# Altium PCB ePBR23_ACU_Power_rev0.PcbDoc (part 4 of 4)
Units mil, origin at the board's own origin, x right, y up, seen from the top; angles counter-clockwise.
Board outline 8165 x 3858 mil, 2 copper layers (Top Layer, Bottom Layer); 138 components, 121 nets, 515 pads, 2055 vias.
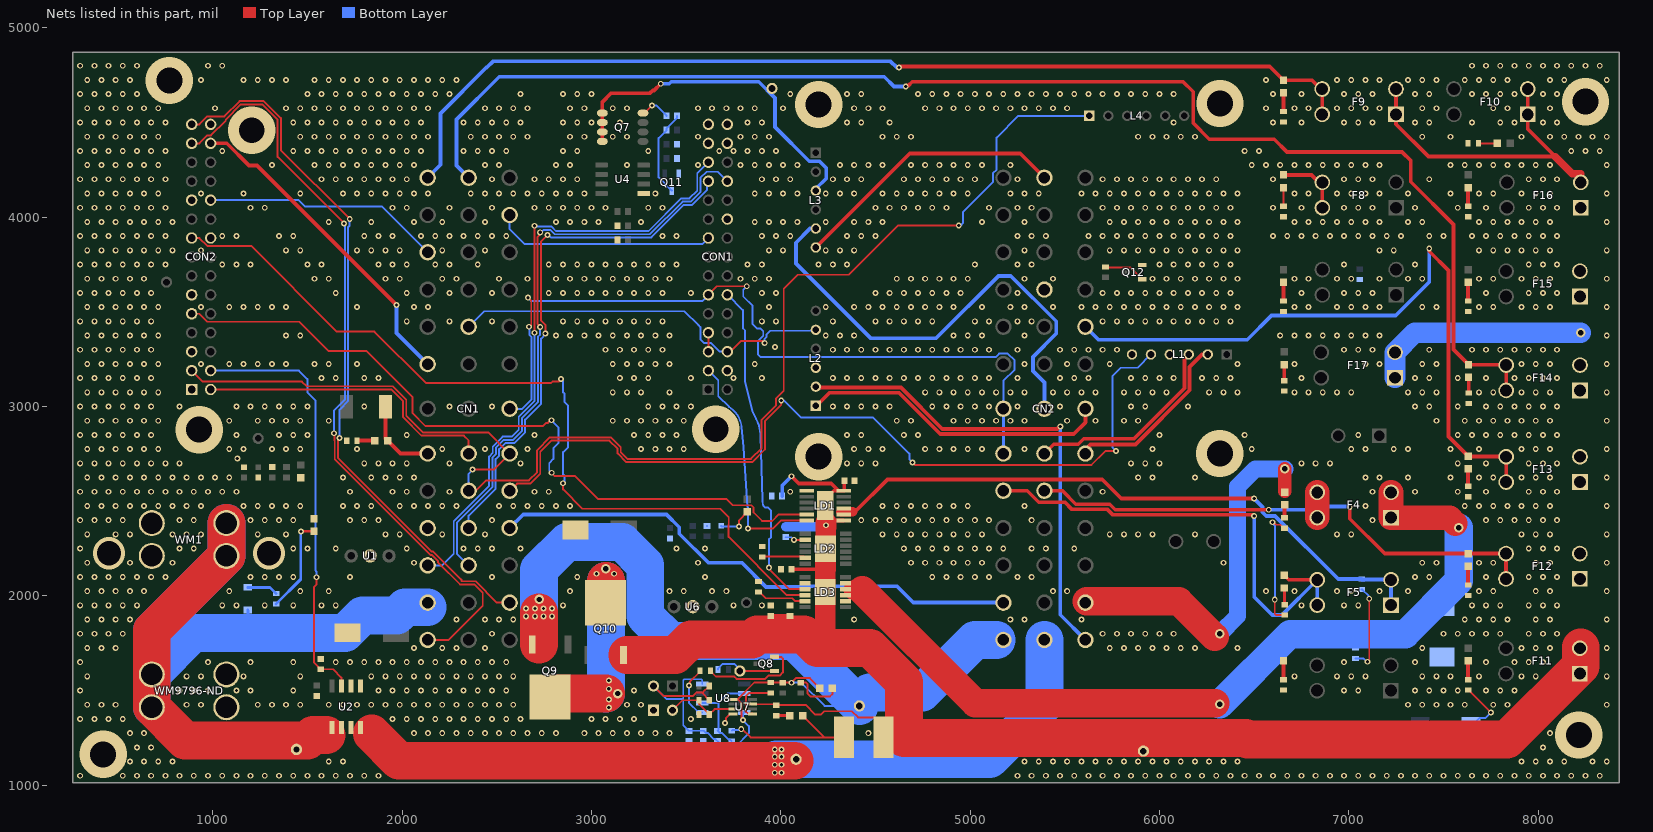
[diagram p3: the nets of this part, all layers, seen from the top]

## Via types
v1: diameter 31, hole 17, Top Layer to Bottom Layer, 2028 vias
v2: diameter 50, hole 28, Top Layer to Bottom Layer, 12 vias
v3: diameter 250, hole 137, Top Layer to Bottom Layer, 11 vias
v4: diameter 170, hole 128, Top Layer to Bottom Layer, 4 vias

## Nets (pads, with @x,y where several pads share a name; then routed paths per layer and width w, separated by ;. In a path a pad name is that pad's centre, name@x,y a point inside that pad or via, vN(x,y) a via of type N, cw(c..) or ccw(c..) an arc to the next point about the centre after c; other vN are vias at no path point) (continued)
GND: C1.1 C2.1 C3.1 C4.1 C5.1 C6.2 C9.2 C11.1 C12.1 C13.1 C14.1 C15.1 C16.2 C17.1 C18.1 C20.1 C21.1 CN1.28 CN2.29 CON1.A3 CON1.A4 CON1.A14 CON1.A15 CON1.B2 CON1.B10 CON1.B14 CON1.B15 CON2.A1 CON2.A3 CON2.A6 CON2.A11 CON2.B9 CON2.B15 D1.2 D2.1 D4.2 D7.2 D22.1 D23.1 JMP2.1 L1.4 L1.6 L2.3 LD1.1 LD2.2 LD3.2 Q11.2 Q12.2 R1.1 R3.2 R9.1 R12.1 R14.2 R15.1 R21.2 R22.2 R23.2 R25.2 R26.2 R27.2 R28.2 R29.2 R30.2 R31.2 R32.2 R33.2 R34.2 R36.2 R37.1 R38.2 R39.2 R42.1 R44.1 R45.1 R48.2 R50.1 R70.1 R71.1 U1.2 U2.5 U2.6 U4.1 U6.2 U7.4 U8.1 WM1.2 WM9796-ND.2 | length 3027.6
  Top Layer w10: v1(3516,1526) 3520.02,1530.02 3520.02,1547.05 3573.44,1600.47 R14.2@3573.44,1604.41 ; CON1.A3@3618.02,3290 CON1.A4@3618.02,3390 ; v1(3706,1329) 3710.02,1333.02 3710.02,1354.35 3732.28,1376.61 U7.4@3748.43,1376.61 ; v1(3779.76,2366.14) 3779.76,2399.65 D4.2@3823.65,2443.53 ; v1@3794.5,1299.1 3840.6,1253 4229.59,1253 ; v1(4070,2295.98) LD2.2@4129.46,2295.98 ; D7.2@4115.15,1367.44 4229.59,1253 ; LD3.2@4121.42,2074.06 LD3.2@4128.23,2067.24 ; C16.2@4333.64,1310.09 C16.2@4333.64,1253 4229.59,1253 ; v1(6597.67,2388.67) 6603.35,2388.67 6616.58,2375.43 6638.07,2375.43 6656.06,2357.44 R22.2@6660,2357.44 ; v1(6609,1980) 6609,1906.02 6616.58,1898.44 R23.2@6661,1898.44 R23.2@6652.22,1907.22 ; v1(7099.12,1652) 7099.12,1657.68 7108.12,1666.68 v1(7108.12,1984.86) ; R28.2@7630,1502.44 7633.94,1502.44 7750,1386.38 v1(7750,1384)
  Bottom Layer w10: v1(3516,1526) 3516,1434.16 3565.52,1384.65 U8.1@3585.2,1384.65 ; R15.1@3610,2370.06 R15.1@3610.06,2370 ; C13.1@3685,2370 3688.86,2366.14 v1(3779.76,2366.14) ; R42.1@3740.87,1287.56 3745.31,1292.01 3787.41,1292.01 v1(3791.43,1296.03) ; C17.1@4026,2309.88 4054.44,2309.88 4068.34,2295.98 v1(4070,2295.98) ; v1(6597.67,2388.67) 6597.67,2382.98 6609.12,2371.53 v1@6609.12,1980 ; R37.1@7035,1670 7075.44,1670 7093.44,1652 v1(7099.12,1652) ; R39.2@7068,2033.44 7071.94,2033.44 7104.1,2001.27 7104.1,1988.88 v1(7108.12,1984.86) ; D23.1@7644.86,1295 7644.86,1310 7689.86,1355 7721,1355 v1(7750,1384)
  other v1: 300,1050 525,1050 600,1050 675,1050 750,1050 825,1050 900,1050 975,1050 1050,1050 1125,1050 1200,1050 1275,1050 1350,1050 1425,1050 1500,1050 1575,1050 1650,1050 1725,1050 1800,1050 1875,1050 5250,1050 5325,1050 5400,1050 5475,1050 5550,1050 5625,1050 5700,1050 5775,1050 5850,1050 5925,1050 6000,1050 6075,1050 6150,1050 6225,1050 6300,1050 6375,1050 6450,1050 6525,1050 6600,1050 6675,1050 6750,1050 6825,1050 6900,1050 6975,1050 7050,1050 7125,1050 7200,1050 7275,1050 7350,1050 7425,1050 7500,1050 7575,1050 7650,1050 7725,1050 7800,1050 7875,1050 7950,1050 8025,1050 8100,1050 8175,1050 8250,1050 8325,1050 562.5,1125 637.5,1125 712.5,1125 787.5,1125 1612.5,1125 1687.5,1125 5287.5,1125 5362.5,1125 5437.5,1125 5512.5,1125 5587.5,1125 5662.5,1125 5737.5,1125 5812.5,1125 5887.5,1125 5962.5,1125 6037.5,1125 6112.5,1125 6187.5,1125 6262.5,1125 6337.5,1125 6412.5,1125 7912.5,1125 7987.5,1125 8062.5,1125 8137.5,1125 8287.5,1125 8362.5,1125 600,1200 675,1200 8025,1200 562.5,1275 637.5,1275 2062.5,1275 2137.5,1275 2212.5,1275 2287.5,1275 2362.5,1275 2437.5,1275 2512.5,1275 2587.5,1275 2662.5,1275 2737.5,1275 2812.5,1275 2962.5,1275 3037.5,1275 3112.5,1275 3187.5,1275 3262.5,1275 3337.5,1275 3412.5,1275 4462.5,1275 8062.5,1275 300,1350 375,1350 450,1350 525,1350 1950,1350 2025,1350 2100,1350 2175,1350 2250,1350 2325,1350 2400,1350 2475,1350 2550,1350 2625,1350 3000,1350 3075,1350 3150,1350 3225,1350 3525,1350 337.5,1425 412.5,1425 487.5,1425 862.5,1425 937.5,1425 1237.5,1425 1312.5,1425 1387.5,1425 1462.5,1425 1612.5,1425 1687.5,1425 1762.5,1425 1837.5,1425 1912.5,1425 1987.5,1425 2062.5,1425 2137.5,1425 2212.5,1425 2287.5,1425 2362.5,1425 2437.5,1425 2512.5,1425 2587.5,1425 3187.5,1425 3262.5,1425 7312.5,1425 7387.5,1425 7462.5,1425 7537.5,1425 7612.5,1425 7762.5,1425 7837.5,1425 8362.5,1425 300,1500 825,1500 900,1500 975,1500 1125,1500 1200,1500 1425,1500 1875,1500 1950,1500 2025,1500 2100,1500 2175,1500 2250,1500 2325,1500 2400,1500 2475,1500 2550,1500 3225,1500 6975,1500 7050,1500 7350,1500 7425,1500 7500,1500 7575,1500 7725,1500 7800,1500 7875,1500 337.5,1575 862.5,1575 937.5,1575 1162.5,1575 1462.5,1575 1837.5,1575 1912.5,1575 1987.5,1575 2062.5,1575 2137.5,1575 2212.5,1575 2287.5,1575 2362.5,1575 2437.5,1575 2512.5,1575 2587.5,1575 6712.5,1575 6937.5,1575 7012.5,1575 7087.5,1575 7387.5,1575 7462.5,1575 7537.5,1575 7687.5,1575 7912.5,1575 7987.5,1575 8362.5,1575 300,1650 975,1650 1200,1650 1425,1650 1650,1650 1725,1650 1800,1650 1875,1650 1950,1650 2025,1650 2100,1650 2175,1650 2250,1650 2325,1650 2400,1650 2475,1650 2550,1650 6975,1650 7350,1650 7725,1650 7875,1650 7950,1650 8025,1650 337.5,1725 412.5,1725 487.5,1725 2062.5,1725 2212.5,1725 2287.5,1725 2437.5,1725 5737.5,1725 5812.5,1725 5887.5,1725 5962.5,1725 6037.5,1725 6112.5,1725 6187.5,1725 6412.5,1725 7387.5,1725 7912.5,1725 7987.5,1725 8062.5,1725 8362.5,1725 300,1800 375,1800 450,1800 525,1800 2475,1800 5700,1800 5775,1800 5850,1800 5925,1800 6000,1800 6075,1800 7500,1800 7575,1800 7650,1800 7725,1800 7800,1800 7950,1800 8025,1800 8100,1800 337.5,1875 412.5,1875 487.5,1875 562.5,1875 2287.5,1875 2437.5,1875 2512.5,1875 2587.5,1875 4387.5,1875 5212.5,1875 5287.5,1875 5587.5,1875 7612.5,1875 7687.5,1875 7762.5,1875 7837.5,1875 7987.5,1875 8062.5,1875 8362.5,1875 300,1950 375,1950 450,1950 525,1950 600,1950 1050,1950 1125,1950 1275,1950 1425,1950 1575,1950 1650,1950 2850,1950 3750,1950 3900,1950 6750,1950 6975,1950 7050,1950 7650,1950 7725,1950 7800,1950 7950,1950 8025,1950 8100,1950 337.5,2025 412.5,2025 487.5,2025 562.5,2025 637.5,2025 1087.5,2025 1462.5,2025 1612.5,2025 2887.5,2025 3412.5,2025 3487.5,2025 3637.5,2025 3712.5,2025 5437.5,2025 5512.5,2025 6562.5,2025 6712.5,2025 6937.5,2025 7012.5,2025 7162.5,2025 7312.5,2025 7687.5,2025 7762.5,2025 7987.5,2025 8062.5,2025 8362.5,2025 300,2100 375,2100 450,2100 525,2100 600,2100 675,2100 750,2100 1200,2100 1275,2100 1350,2100 1425,2100 1725,2100 2475,2100 2925,2100 3600,2100 4800,2100 4875,2100 4950,2100 5025,2100 5100,2100 5250,2100 5325,2100 7350,2100 7425,2100 7725,2100 7950,2100 8025,2100 8100,2100 337.5,2175 562.5,2175 787.5,2175 2062.5,2175 3562.5,2175 4687.5,2175 4762.5,2175 4837.5,2175 4912.5,2175 4987.5,2175 5062.5,2175 6337.5,2175 7387.5,2175 7462.5,2175 7687.5,2175 7762.5,2175 7987.5,2175 8062.5,2175 8362.5,2175 300,2250 825,2250 900,2250 1425,2250 1500,2250 1650,2250 2025,2250 2325,2250 2400,2250 2475,2250 2625,2250 3450,2250 3600,2250 4650,2250 4725,2250 4800,2250 4875,2250 4950,2250 5025,2250 5100,2250 5175,2250 5325,2250 5400,2250 5550,2250 7950,2250 8025,2250 8100,2250 337.5,2325 487.5,2325 562.5,2325 787.5,2325 862.5,2325 937.5,2325 1237.5,2325 1387.5,2325 1912.5,2325 1987.5,2325 2212.5,2325 2437.5,2325 4537.5,2325 4612.5,2325 4687.5,2325 4762.5,2325 4837.5,2325 4912.5,2325 4987.5,2325 5062.5,2325 5737.5,2325 5812.5,2325 5887.5,2325 5962.5,2325 6187.5,2325 6937.5,2325 7012.5,2325 7912.5,2325 7987.5,2325 8062.5,2325 8362.5,2325 300,2400 375,2400 450,2400 525,2400 825,2400 900,2400 1200,2400 1275,2400 1350,2400 1425,2400 1725,2400 1800,2400 1875,2400 2475,2400 4425,2400 4500,2400 4575,2400 4650,2400 4725,2400 4800,2400 4875,2400 4950,2400 5025,2400 5100,2400 5325,2400 7125,2400 7725,2400 7800,2400 7875,2400 7950,2400 8025,2400 8100,2400 337.5,2475 412.5,2475 487.5,2475 562.5,2475 637.5,2475 712.5,2475 787.5,2475 862.5,2475 937.5,2475 1162.5,2475 1237.5,2475 1312.5,2475 1387.5,2475 1462.5,2475 1687.5,2475 1762.5,2475 1837.5,2475 1987.5,2475 2062.5,2475 2137.5,2475 2212.5,2475 2287.5,2475 2512.5,2475 2587.5,2475 2662.5,2475 2737.5,2475 2812.5,2475 2887.5,2475 4537.5,2475 4612.5,2475 4687.5,2475 4762.5,2475 4837.5,2475 4912.5,2475 4987.5,2475 5287.5,2475 7087.5,2475 7612.5,2475 7687.5,2475 7762.5,2475 7837.5,2475 7912.5,2475 7987.5,2475 8062.5,2475 8362.5,2475 300,2550 375,2550 450,2550 525,2550 600,2550 675,2550 750,2550 825,2550 900,2550 975,2550 1050,2550 1125,2550 1725,2550 1950,2550 2025,2550 2250,2550 2700,2550 2775,2550 4050,2550 5700,2550 7125,2550 7350,2550 7575,2550 7725,2550 7950,2550 8025,2550 8100,2550 337.5,2625 412.5,2625 487.5,2625 562.5,2625 637.5,2625 712.5,2625 787.5,2625 862.5,2625 937.5,2625 1012.5,2625 1087.5,2625 1687.5,2625 1837.5,2625 1912.5,2625 1987.5,2625 2062.5,2625 5887.5,2625 5962.5,2625 6187.5,2625 7087.5,2625 7162.5,2625 7312.5,2625 7537.5,2625 7687.5,2625 7762.5,2625 7912.5,2625 7987.5,2625 8062.5,2625 8362.5,2625 300,2700 375,2700 450,2700 525,2700 600,2700 675,2700 750,2700 825,2700 1800,2700 1875,2700 1950,2700 2025,2700 2250,2700 2625,2700 4350,2700 4425,2700 4500,2700 5850,2700 5925,2700 6000,2700 6750,2700 6825,2700 6900,2700 7575,2700 7725,2700 7950,2700 8025,2700 8100,2700 1130,2725 337.5,2775 412.5,2775 487.5,2775 562.5,2775 637.5,2775 712.5,2775 1087.5,2775 1162.5,2775 1312.5,2775 1387.5,2775 1462.5,2775 1762.5,2775 2212.5,2775 2437.5,2775 2662.5,2775 3262.5,2775 3337.5,2775 3412.5,2775 3487.5,2775 4387.5,2775 4462.5,2775 4537.5,2775 4762.5,2775 4837.5,2775 4912.5,2775 4987.5,2775 5062.5,2775 5287.5,2775 5962.5,2775 6487.5,2775 7012.5,2775 7087.5,2775 7237.5,2775 7312.5,2775 7537.5,2775 7687.5,2775 7912.5,2775 7987.5,2775 8062.5,2775 8362.5,2775 300,2850 375,2850 450,2850 525,2850 600,2850 675,2850 1125,2850 1350,2850 1425,2850 1500,2850 2025,2850 2700,2850 3225,2850 3300,2850 3375,2850 3450,2850 4350,2850 4425,2850 4650,2850 4725,2850 6000,2850 6450,2850 7050,2850 7575,2850 7650,2850 7725,2850 7800,2850 7875,2850 7950,2850 8025,2850 8100,2850 337.5,2925 412.5,2925 487.5,2925 562.5,2925 637.5,2925 712.5,2925 1087.5,2925 1237.5,2925 1312.5,2925 1387.5,2925 1462.5,2925 1612.5,2925 3112.5,2925 3187.5,2925 3262.5,2925 3337.5,2925 3412.5,2925 3487.5,2925 4612.5,2925 4687.5,2925 4912.5,2925 4987.5,2925 5062.5,2925 5137.5,2925 5212.5,2925 5287.5,2925 5512.5,2925 5662.5,2925 5812.5,2925 5887.5,2925 7462.5,2925 7612.5,2925 7687.5,2925 7762.5,2925 7837.5,2925 7912.5,2925 7987.5,2925 8062.5,2925 8362.5,2925 300,3000 375,3000 450,3000 525,3000 600,3000 675,3000 825,3000 1125,3000 1200,3000 1275,3000 1350,3000 1425,3000 1500,3000 1800,3000 2250,3000 2475,3000 3300,3000 3375,3000 3450,3000 3525,3000 4275,3000 4350,3000 4425,3000 4500,3000 4575,3000 4800,3000 4875,3000 4950,3000 5025,3000 5100,3000 5250,3000 5475,3000 5850,3000 5925,3000 6150,3000 7350,3000 7425,3000 7575,3000 7725,3000 7800,3000 7875,3000 7950,3000 8025,3000 8100,3000 337.5,3075 412.5,3075 487.5,3075 562.5,3075 637.5,3075 712.5,3075 3112.5,3075 3187.5,3075 3262.5,3075 3412.5,3075 4762.5,3075 4837.5,3075 4912.5,3075 4987.5,3075 5062.5,3075 5137.5,3075 5212.5,3075 5287.5,3075 5437.5,3075 5512.5,3075 5587.5,3075 5662.5,3075 5812.5,3075 5887.5,3075 5962.5,3075 6037.5,3075 6262.5,3075 6337.5,3075 6412.5,3075 6712.5,3075 6787.5,3075 6862.5,3075 6937.5,3075 7012.5,3075 7312.5,3075 7387.5,3075 7462.5,3075 7687.5,3075 7762.5,3075 7912.5,3075 7987.5,3075 8062.5,3075 8362.5,3075 300,3150 375,3150 450,3150 525,3150 600,3150 675,3150 1575,3150 1650,3150 1800,3150 1875,3150 3150,3150 3225,3150 3300,3150 3525,3150 3750,3150 3900,3150 4275,3150 4350,3150 4425,3150 4500,3150 4575,3150 4650,3150 4725,3150 4800,3150 4875,3150 4950,3150 5025,3150 5100,3150 5250,3150 5475,3150 5550,3150 5625,3150 5850,3150 5925,3150 6000,3150 6075,3150 6225,3150 6300,3150 6375,3150 6750,3150 7350,3150 7425,3150 7575,3150 7725,3150 7875,3150 7950,3150 8025,3150 8100,3150 337.5,3225 412.5,3225 487.5,3225 562.5,3225 637.5,3225 712.5,3225 937.5,3225 1087.5,3225 1162.5,3225 1237.5,3225 1312.5,3225 1387.5,3225 1537.5,3225 1612.5,3225 1762.5,3225 3112.5,3225 3187.5,3225 3262.5,3225 3337.5,3225 3412.5,3225 3862.5,3225 5287.5,3225 5512.5,3225 5737.5,3225 6412.5,3225 6712.5,3225 7087.5,3225 7162.5,3225 7387.5,3225 7462.5,3225 7912.5,3225 7987.5,3225 8062.5,3225 8362.5,3225 300,3300 375,3300 450,3300 525,3300 600,3300 675,3300 3075,3300 3150,3300 3225,3300 3300,3300 3375,3300 4275,3300 4350,3300 4425,3300 4500,3300 4575,3300 4650,3300 4725,3300 4800,3300 4875,3300 4950,3300 5025,3300 5100,3300 5250,3300 5475,3300 5550,3300 5625,3300 5700,3300 5775,3300 6975,3300 7050,3300 7125,3300 7425,3300 7650,3300 7725,3300 7800,3300 7875,3300 7950,3300 8025,3300 8100,3300 3970,3315 337.5,3375 412.5,3375 487.5,3375 562.5,3375 637.5,3375 712.5,3375 1387.5,3375 1462.5,3375 2812.5,3375 2887.5,3375 2962.5,3375 3037.5,3375 3112.5,3375 3187.5,3375 3262.5,3375 3337.5,3375 3412.5,3375 4237.5,3375 4312.5,3375 4387.5,3375 4912.5,3375 4987.5,3375 5062.5,3375 5287.5,3375 6637.5,3375 6712.5,3375 6787.5,3375 6862.5,3375 6937.5,3375 7012.5,3375 7087.5,3375 7162.5,3375 8362.5,3375 300,3450 375,3450 450,3450 525,3450 600,3450 675,3450 2025,3450 2250,3450 2475,3450 2850,3450 2925,3450 3000,3450 3075,3450 3150,3450 3225,3450 3300,3450 3375,3450 3900,3450 3975,3450 4275,3450 4500,3450 4575,3450 4650,3450 4725,3450 4800,3450 5025,3450 5100,3450 5250,3450 5325,3450 5700,3450 5775,3450 5850,3450 5925,3450 6000,3450 6075,3450 6150,3450 6225,3450 6300,3450 6375,3450 337.5,3525 412.5,3525 487.5,3525 562.5,3525 637.5,3525 712.5,3525 937.5,3525 1087.5,3525 1162.5,3525 1237.5,3525 1312.5,3525 1387.5,3525 1762.5,3525 2062.5,3525 2137.5,3525 3937.5,3525 4237.5,3525 4387.5,3525 4462.5,3525 4537.5,3525 4612.5,3525 4687.5,3525 4762.5,3525 4837.5,3525 4912.5,3525 5062.5,3525 5212.5,3525 5287.5,3525 5437.5,3525 5587.5,3525 5662.5,3525 5737.5,3525 5812.5,3525 5887.5,3525 5962.5,3525 6037.5,3525 6112.5,3525 6187.5,3525 6262.5,3525 6337.5,3525 6412.5,3525 6712.5,3525 6787.5,3525 6937.5,3525 7012.5,3525 7087.5,3525 7162.5,3525 7387.5,3525 7462.5,3525 7687.5,3525 7762.5,3525 7912.5,3525 7987.5,3525 8062.5,3525 8362.5,3525 300,3600 375,3600 450,3600 525,3600 600,3600 675,3600 1650,3600 2025,3600 2250,3600 2475,3600 2775,3600 2850,3600 2925,3600 3000,3600 3075,3600 3150,3600 3225,3600 3300,3600 3375,3600 3525,3600 3900,3600 3975,3600 4500,3600 4575,3600 4650,3600 4725,3600 4800,3600 4875,3600 4950,3600 5250,3600 5700,3600 5775,3600 5850,3600 5925,3600 6000,3600 6075,3600 6150,3600 6225,3600 6300,3600 6375,3600 6750,3600 6975,3600 7050,3600 7125,3600 7725,3600 7950,3600 8025,3600 8100,3600 337.5,3675 412.5,3675 487.5,3675 562.5,3675 637.5,3675 1537.5,3675 1612.5,3675 1912.5,3675 1987.5,3675 2212.5,3675 2287.5,3675 2512.5,3675 2662.5,3675 2812.5,3675 2887.5,3675 2962.5,3675 3037.5,3675 3112.5,3675 3187.5,3675 3262.5,3675 3337.5,3675 3412.5,3675 3787.5,3675 3862.5,3675 3937.5,3675 4612.5,3675 4687.5,3675 4762.5,3675 4837.5,3675 4912.5,3675 4987.5,3675 5287.5,3675 5437.5,3675 5962.5,3675 6037.5,3675 6112.5,3675 6187.5,3675 6262.5,3675 6337.5,3675 6412.5,3675 6712.5,3675 6787.5,3675 6937.5,3675 7012.5,3675 7162.5,3675 7312.5,3675 7387.5,3675 7687.5,3675 7762.5,3675 7912.5,3675 7987.5,3675 8062.5,3675 8362.5,3675 300,3750 375,3750 450,3750 525,3750 600,3750 675,3750 750,3750 1050,3750 1125,3750 1200,3750 1500,3750 1575,3750 1875,3750 1950,3750 2025,3750 2175,3750 2250,3750 2400,3750 2775,3750 2850,3750 2925,3750 3000,3750 3075,3750 3150,3750 3225,3750 3300,3750 3375,3750 3450,3750 3825,3750 3900,3750 4200,3750 4275,3750 4350,3750 5025,3750 5250,3750 5325,3750 6000,3750 6075,3750 6150,3750 6225,3750 6300,3750 6375,3750 6975,3750 7350,3750 7950,3750 8025,3750 8100,3750 337.5,3825 412.5,3825 487.5,3825 562.5,3825 637.5,3825 712.5,3825 787.5,3825 937.5,3825 1387.5,3825 1462.5,3825 1762.5,3825 1837.5,3825 1912.5,3825 1987.5,3825 2212.5,3825 2437.5,3825 3937.5,3825 4012.5,3825 4237.5,3825 4312.5,3825 4387.5,3825 5287.5,3825 5737.5,3825 5812.5,3825 5887.5,3825 5962.5,3825 6037.5,3825 6112.5,3825 6187.5,3825 6262.5,3825 6337.5,3825 6412.5,3825 7162.5,3825 7237.5,3825 7687.5,3825 7762.5,3825 7837.5,3825 7912.5,3825 7987.5,3825 8062.5,3825 8362.5,3825 300,3900 375,3900 450,3900 525,3900 600,3900 675,3900 750,3900 1050,3900 1125,3900 1350,3900 1425,3900 1800,3900 1875,3900 1950,3900 2100,3900 2175,3900 2250,3900 2325,3900 2400,3900 2475,3900 2550,3900 3375,3900 3450,3900 3900,3900 3975,3900 4050,3900 4350,3900 4425,3900 4500,3900 5250,3900 5325,3900 5400,3900 5625,3900 5700,3900 5775,3900 5850,3900 5925,3900 6000,3900 6075,3900 6150,3900 6225,3900 6300,3900 6375,3900 6600,3900 6675,3900 6750,3900 6825,3900 6900,3900 6975,3900 7050,3900 7125,3900 7200,3900 7275,3900 7425,3900 7500,3900 7650,3900 7725,3900 7800,3900 7875,3900 7950,3900 8025,3900 8100,3900 337.5,3975 412.5,3975 487.5,3975 562.5,3975 637.5,3975 712.5,3975 787.5,3975 1612.5,3975 1837.5,3975 2062.5,3975 2212.5,3975 2437.5,3975 2812.5,3975 2887.5,3975 2962.5,3975 3037.5,3975 3262.5,3975 3862.5,3975 3937.5,3975 4012.5,3975 4087.5,3975 4237.5,3975 4387.5,3975 4462.5,3975 4537.5,3975 5062.5,3975 5287.5,3975 5737.5,3975 5812.5,3975 5887.5,3975 5962.5,3975 6037.5,3975 6112.5,3975 6187.5,3975 6262.5,3975 6337.5,3975 6412.5,3975 6712.5,3975 6787.5,3975 6862.5,3975 6937.5,3975 7012.5,3975 7087.5,3975 7162.5,3975 7312.5,3975 7387.5,3975 7687.5,3975 7762.5,3975 7837.5,3975 7912.5,3975 7987.5,3975 8062.5,3975 8362.5,3975 300,4050 375,4050 450,4050 525,4050 600,4050 675,4050 750,4050 1200,4050 1275,4050 1950,4050 2025,4050 2250,4050 2475,4050 2700,4050 2775,4050 2850,4050 2925,4050 3000,4050 3075,4050 3300,4050 3375,4050 4500,4050 4575,4050 4650,4050 4725,4050 4800,4050 4875,4050 5100,4050 5250,4050 5325,4050 5700,4050 5775,4050 5850,4050 5925,4050 6000,4050 6075,4050 6150,4050 6225,4050 6300,4050 6375,4050 6600,4050 6750,4050 6975,4050 7050,4050 7125,4050 7350,4050 7575,4050 7725,4050 7950,4050 8025,4050 8100,4050 337.5,4125 412.5,4125 487.5,4125 562.5,4125 637.5,4125 712.5,4125 937.5,4125 1162.5,4125 1462.5,4125 1687.5,4125 1762.5,4125 1837.5,4125 1912.5,4125 1987.5,4125 2062.5,4125 2137.5,4125 2362.5,4125 2437.5,4125 2512.5,4125 2587.5,4125 2662.5,4125 2737.5,4125 2812.5,4125 2887.5,4125 2962.5,4125 3337.5,4125 3862.5,4125 3937.5,4125 4012.5,4125 4087.5,4125 4237.5,4125 4312.5,4125 4387.5,4125 4537.5,4125 4612.5,4125 4687.5,4125 4762.5,4125 4837.5,4125 4912.5,4125 4987.5,4125 5212.5,4125 5287.5,4125 5362.5,4125 5587.5,4125 5662.5,4125 5737.5,4125 5812.5,4125 5887.5,4125 5962.5,4125 6037.5,4125 6112.5,4125 6187.5,4125 6262.5,4125 6337.5,4125 6412.5,4125 6712.5,4125 6787.5,4125 6937.5,4125 7012.5,4125 7087.5,4125 7162.5,4125 7312.5,4125 7537.5,4125 7687.5,4125 7762.5,4125 7912.5,4125 7987.5,4125 8062.5,4125 8362.5,4125 300,4200 375,4200 450,4200 525,4200 600,4200 675,4200 750,4200 1575,4200 1650,4200 1725,4200 1800,4200 1875,4200 1950,4200 2025,4200 2475,4200 2700,4200 2775,4200 2850,4200 2925,4200 3900,4200 3975,4200 4050,4200 4275,4200 4350,4200 4425,4200 4650,4200 4725,4200 4800,4200 4875,4200 4950,4200 5025,4200 5250,4200 5700,4200 5775,4200 5850,4200 5925,4200 6000,4200 6075,4200 6150,4200 6225,4200 6300,4200 6600,4200 6975,4200 7050,4200 7125,4200 7425,4200 7950,4200 8025,4200 8100,4200 337.5,4275 412.5,4275 487.5,4275 562.5,4275 637.5,4275 712.5,4275 1312.5,4275 1537.5,4275 1612.5,4275 1687.5,4275 1762.5,4275 1837.5,4275 1912.5,4275 1987.5,4275 2062.5,4275 2437.5,4275 2512.5,4275 2812.5,4275 2887.5,4275 3187.5,4275 3562.5,4275 3787.5,4275 3862.5,4275 3937.5,4275 4012.5,4275 4087.5,4275 4312.5,4275 4387.5,4275 4462.5,4275 4537.5,4275 4687.5,4275 4762.5,4275 4837.5,4275 4912.5,4275 4987.5,4275 5062.5,4275 5212.5,4275 6487.5,4275 6562.5,4275 6637.5,4275 6712.5,4275 6787.5,4275 6862.5,4275 6937.5,4275 7012.5,4275 7087.5,4275 7162.5,4275 7537.5,4275 7612.5,4275 7687.5,4275 7762.5,4275 7837.5,4275 7912.5,4275 7987.5,4275 8062.5,4275 8362.5,4275 300,4350 375,4350 450,4350 525,4350 600,4350 675,4350 750,4350 1050,4350 1425,4350 1500,4350 1575,4350 1650,4350 1725,4350 1800,4350 1875,4350 1950,4350 2025,4350 2100,4350 2325,4350 2400,4350 2475,4350 2550,4350 2850,4350 2925,4350 3300,4350 3675,4350 3750,4350 3825,4350 3900,4350 3975,4350 6450,4350 6525,4350 8175,4350 8250,4350 8325,4350 337.5,4425 412.5,4425 487.5,4425 562.5,4425 637.5,4425 712.5,4425 1462.5,4425 1537.5,4425 1612.5,4425 1687.5,4425 1762.5,4425 1837.5,4425 1912.5,4425 1987.5,4425 2062.5,4425 2137.5,4425 2362.5,4425 2437.5,4425 2512.5,4425 2587.5,4425 2662.5,4425 2887.5,4425 2962.5,4425 3112.5,4425 3187.5,4425 3562.5,4425 3787.5,4425 3862.5,4425 3937.5,4425 4537.5,4425 4612.5,4425 4687.5,4425 5887.5,4425 5962.5,4425 6037.5,4425 6112.5,4425 6187.5,4425 7387.5,4425 7537.5,4425 7912.5,4425 8062.5,4425 8137.5,4425 8212.5,4425 8287.5,4425 8362.5,4425 300,4500 375,4500 450,4500 525,4500 600,4500 675,4500 750,4500 1425,4500 1500,4500 1575,4500 1650,4500 1725,4500 1800,4500 1875,4500 1950,4500 2025,4500 2100,4500 2325,4500 2400,4500 2475,4500 2550,4500 2625,4500 2850,4500 2925,4500 3000,4500 3150,4500 3825,4500 3900,4500 4350,4500 4425,4500 4575,4500 6075,4500 6600,4500 6750,4500 6975,4500 7050,4500 7125,4500 7350,4500 7425,4500 7650,4500 7800,4500 7875,4500 8025,4500 8100,4500 337.5,4575 412.5,4575 487.5,4575 562.5,4575 637.5,4575 712.5,4575 1012.5,4575 1387.5,4575 1462.5,4575 1537.5,4575 1612.5,4575 1687.5,4575 1762.5,4575 1837.5,4575 1912.5,4575 1987.5,4575 2062.5,4575 2137.5,4575 2437.5,4575 2512.5,4575 2587.5,4575 2662.5,4575 2887.5,4575 2962.5,4575 3112.5,4575 3187.5,4575 3562.5,4575 3637.5,4575 3712.5,4575 3787.5,4575 3862.5,4575 4012.5,4575 4387.5,4575 4462.5,4575 4537.5,4575 4762.5,4575 4837.5,4575 4912.5,4575 4987.5,4575 5062.5,4575 5137.5,4575 5212.5,4575 5287.5,4575 5362.5,4575 5437.5,4575 5512.5,4575 6562.5,4575 6712.5,4575 6787.5,4575 6937.5,4575 7012.5,4575 7087.5,4575 7162.5,4575 7387.5,4575 7462.5,4575 7762.5,4575 7837.5,4575 8062.5,4575 300,4650 375,4650 450,4650 525,4650 600,4650 1500,4650 1575,4650 1650,4650 1725,4650 1800,4650 1875,4650 1950,4650 2025,4650 2100,4650 2175,4650 2250,4650 2625,4650 2850,4650 2925,4650 3000,4650 4050,4650 4350,4650 4425,4650 4725,4650 4800,4650 4875,4650 4950,4650 5025,4650 5100,4650 5175,4650 5250,4650 5325,4650 5400,4650 5475,4650 5550,4650 5625,4650 5700,4650 5775,4650 5850,4650 5925,4650 6000,4650 6075,4650 6600,4650 6750,4650 6975,4650 7050,4650 7125,4650 7350,4650 7425,4650 7650,4650 7725,4650 7800,4650 7875,4650 8025,4650 8100,4650 337.5,4725 412.5,4725 487.5,4725 562.5,4725 937.5,4725 1162.5,4725 1237.5,4725 1312.5,4725 1387.5,4725 1537.5,4725 1612.5,4725 1687.5,4725 1762.5,4725 1837.5,4725 1912.5,4725 1987.5,4725 2062.5,4725 2137.5,4725 2212.5,4725 2287.5,4725 6562.5,4725 6937.5,4725 7012.5,4725 7087.5,4725 7162.5,4725 7312.5,4725 7387.5,4725 7462.5,4725 7612.5,4725 7687.5,4725 7762.5,4725 7837.5,4725 8062.5,4725 8137.5,4725 8362.5,4725 300,4800 375,4800 450,4800 525,4800 600,4800 975,4800 1050,4800 7650,4800 7725,4800 7800,4800 7875,4800 7950,4800 8025,4800 8100,4800 8175,4800 8250,4800 8325,4800
  other v3: 421,1163 8215,1265 4200,2735 6318.57,2751.78 928.5,2878.08 3656.5,2880 1206,4459 4200,4595 6320,4600 8250,4610 771,4722
  other v4: 452.71,2224.78 1297.59,2224.78
GREEN_LED_GND: CN2.17 L1.3 | length 1070
  Top Layer w20: CN2.17@5392.52,2751.78 5441.74,2801 5571,2801 5600,2830 5865,2830 6132,3097 6132,3252 L1.3@6155,3275
HCP_H_CURR_SENS: CN1.23 CON2.B1 | length 1593.3
  Top Layer w10: CON2.B1@989,3090 1943.63,3090 2005,3028.63 2005,2943.62 2102.62,2846 2327.02,2846 2350.86,2822.15 2350.86,2752.45 CN1.23@2351.54,2751.78
HCP_L_CURR_SENS: CN1.24 CN1.26 CON2.A2 L4.1 | length 7123.4
  Top Layer w10: CON2.A2@889,3190 946.88,3132.12 1471.46,3132.12 1496.58,3107 1950.67,3107 2022,3035.67 2022,2950.66 2109.66,2863 2455.9,2863 2567.12,2751.78 CN1.24@2568.07,2751.78 2483.29,2667 v1(2372,2667) ; CN1.26@2351.54,2554.93 2388.28,2554.93 2443.59,2610.24 2590.98,2610.24 2591.22,2610 2670.06,2610 2713,2652.94 2713,2769.08 2780.92,2837 3102.04,2837 3154.79,2784.25 3154.79,2759.25 3190.33,2723.71 3842.59,2723.71 3899,2780.12 3899,2929.7 3975.06,3005.76 3975.06,3043.39 4015.5,3083.83 4015.5,3621.57 4089.93,3696 4358.07,3696 4617.66,3955.59 v1(4940,3955.59)
  Bottom Layer w10: CN1.26@2351.54,2554.93 2351.54,2644.33 2372,2664.8 v1(2372,2667) ; v1(4940,3955.59) 4940.18,3955.42 4949.7,3955.42 4962.28,3968 4963,3968 4963,4028 5120.68,4185.68 5120.68,4231.38 5140,4250.7 5140,4420 5255,4535 L4.1@5630,4535
HCP_SENS_PWR: CN1.22 D3.1 F1.2 | length 424.1
  Top Layer w20: F1.2@1912.95,3000 1912.95,2830.51 D3.1@1923.46,2820 1991.69,2751.78 CN1.22@2135,2751.78
HVB_PWR: CN1.2 D18.1 F14.3 F14.4 | length 7306.7
  Top Layer w20: v1(4660,4690) 4665.5,4695.5 4674.65,4695.5 4694.15,4715 6125,4715 6178,4662 6178,4497 6263,4412 6606.63,4412 6673.63,4345 7281.43,4345 7327.43,4299 7327.43,4187.57 7553,3962 7553,3300.46 D18.1@7632,3221.46 7633.27,3220.2 7829.85,3220.2 F14.4@7831.12,3218.93 F14.3@7831.12,3085.07
  Bottom Layer w20: CN1.2@2351.54,4208.47 2287,4273.01 2287,4515.63 2513.37,4742 4546.63,4742 4598.63,4690 v1(4660,4690)
IMD_LED: CN2.38 L3.6 | length 1465.8
  Top Layer w20: L3.6@4185,3840 4681,4336 5264.99,4336 CN2.38@5392.52,4208.47
IMD_OK: CN1.14 CON1.B3 L2.5 | length 2084.7
  Top Layer w10: CON1.B3@3718.02,3290 3723.02,3285 3736.02,3298 3739.02,3295 3789.26,3345.24 3904.76,3345.24 v1(3915,3335)
  Bottom Layer w10: CN1.14@2351.54,3421.07 2433.46,3503 3490.96,3503 3565.96,3428 3567,3428 3575.9,3419.1 3575.9,3354.1 3595,3335 3632.58,3335 3677.58,3290 CON1.B3@3718.02,3290 ; v1@3915,3325.23 v1(3915,3335) 3915,3357.07 3924.5,3366.57 3924.5,3379.5 3945,3400 L2.5@4185,3400
IMD_PWR: CN1.1 D14.1 F9.3 F9.4 | length 5337.3
  Top Layer w20: v1(4625,4790) 4631,4796 6582.46,4796 D14.1@6655,4723.46 6805,4723.46 6851.53,4676.93 F9.4@6859.35,4676.93 F9.3@6859.35,4543.07
  Bottom Layer w20: CN1.1@2135,4208.47 2203,4276.47 2203,4548 2445,4790 2446.82,4790 2479.82,4823 4580.18,4823 4613.18,4790 v1(4625,4790)
IMD_RESIST: CN1.7 CON2.B11 | length 1260
  Bottom Layer w10: CON2.B11@989,4090 1454.02,4090 1487.02,4057 1892.77,4057 CN1.7@2135,3814.77
LATCH_RST: CN2.1 L2.2 | length 2569.5
  Top Layer w20: L2.2@4185,3100 4635,3100 4853,2882 5458.44,2882 5471.44,2895 v1(5476.44,2895)
  Bottom Layer w20: v1(5476.44,2895) 5476.44,1900.14 CN2.1@5609.06,1767.53
LATCHING_Delayed: L3.3 LATCHING_Delayed.1 Q7.5 Q7.6 Q7.7 Q7.8 | length 1855.3
  Top Layer w20: Q7.8@3057.72,4400 Q7.7@3057.72,4450 Q7.6@3057.72,4500 Q7.5@3057.72,4550 3057.72,4607.72 3105,4655 3310,4655 3323.49,4668.49 3329.95,4668.49 v1(3365.97,4704.5)
  Bottom Layer w20: v1(3365.97,4704.5) 3366.47,4705 3411.47,4705 3421.47,4715 3883.96,4715 3970,4628.96 3970,4475.92 4150.44,4295.48 4204.52,4295.48 4240,4260 4240,4205 4185,4150 L3.3@4185,4140
LVBATT_CURR_SENS: C5.2 CON2.B2 U2.7 | length 2275.1
  Top Layer w10: v1(1548.03,2098.57) 1548.03,2059.14 1534,2045.11 1534,1648.44 1557.28,1625.16 1557.28,1623.19 1568.03,1612.44 C5.2@1570,1612.44 1635.56,1612.44 1679.17,1568.83 1679.17,1526.06 U2.7@1680,1525.24
  Bottom Layer w10: CON2.B2@989,3190 1455,3190 1500,3145 1500,3075 1542,3033 1542,2134.07 1547.51,2128.56 1547.51,2099.09 v1(1548.03,2098.57)
MC_PWR: CN2.15 D10.1 F5.3 F5.4 | length 2563.4
  Top Layer w20: CN2.15@5175.98,2554.93 5301.99,2554.93 5362.3,2494.62 5500.38,2494.62 5538,2457 5726.18,2457 5755.18,2428 v1@6492.19,2428 ; D10.1@6659,2108.46 6682.61,2084.86 F5.4@6833.12,2084.86
  Bottom Layer w20: v1(6500,2422.5) 6500,1995.16 6595.66,1899.5 6647.76,1899.5 F5.4@6833.12,2084.86 F5.3@6833.12,1951
MC_PWR_CTRL: CON1.A2 LD1.6 | length 1233.6
  Top Layer w10: v1(3827,2356) 3959.67,2356 4002.56,2398.89 4136.93,2398.89 LD1.6@4137.56,2398.26
  Bottom Layer w10: CON1.A2@3619,3190 3670,3139 3670,3055 3726.7,2998.3 3736.76,2991.03 cw(c3656.5,2880) 3792.86,2893.22 3803.41,2784.47 3825,2468.47 3827.93,2465.54 3827.93,2356.93 v1(3827,2356)
MC_PWR_FB: CON2.A5 LD1.5 | length 4008.6
  Top Layer w10: CON2.A5@889,3490 929.44,3490 971.55,3447.88 1457.12,3447.88 1611,3294 1811.75,3294 2056,3049.75 2056,2964.74 2123.74,2897 2743.78,2897 2760.78,2914 2769.95,2914 2783.31,2927.36 v1(2788.99,2927.36) ; v1(2790,2650) 2807.5,2632.5 2913.54,2632.5 3035.04,2511 3714.72,2511 3746.94,2478.78 3844.74,2478.78 3855.99,2467.54 3855.99,2441.08 3901.57,2395.5 3954.86,2395.5 3989.59,2430.23 4137.09,2430.23 LD1.5@4137.56,2429.76
  Bottom Layer w10: v1(2788.99,2927.36) 2825.5,2890.85 2825.5,2806.67 2799.5,2780.67 2799.5,2723.39 2777.5,2701.39 2777.5,2662.5 v1(2790,2650)
MC_PWR_FUSE: F5.1 F5.2 LD1.8 LD1.9 R39.1 | length 3346
  Top Layer w20: 4379.66,2445.5 4393.21,2445.5 4562.94,2615.24 5697.76,2615.24 5798.5,2514.5 v1(6500,2514.5)
  Top Layer w50: 4317.36,2445.5 4379.66,2445.5
  Bottom Layer w20: v1(6500,2514.5) 6544.5,2470 6544.5,2441.54 6563.54,2422.5 6609.8,2422.5 6943.74,2088.56 R39.1@7068,2088.56 7069.85,2086.71 7221.03,2086.71 F5.2@7222.88,2084.86 F5.1@7222.88,1951
NetD2_2: D2.2 R47.1 | length 505.2
  Top Layer w15: v1(1466.81,2340) 1468.35,2341.53 D2.2@1535,2341.53
  Bottom Layer w15: R47.1@1335,1957.44 1465,2087.44 v1@1465,2340
NetD3_2: D3.2 R3.1 | length 96.4
  Top Layer w20: R3.1@1765,2820 R3.1@1762.56,2820 D3.2@1856.53,2820
NetD5_2: D5.2 R16.2 | length 266.8
  Top Layer w10: R16.2@4109.94,1541.56 R16.2@4106,1541.56 4134.76,1541.56 4140.61,1535.7 4140.61,1485.18 4156.79,1469 4260,1469 4272.47,1481.47 D5.2@4272.47,1513
NetD7_1: D7.1 R40.2 | length 68.5
  Top Layer w15: R40.2@3979.68,1367.44 D7.1@4048.22,1367.44
NetD8_2: D8.2 R21.1 | length 99
  Top Layer w20: R21.1@6655,1557.56 D8.2@6655,1656.53
NetD9_2: D9.2 R22.1 | length 70.7
  Top Layer w20: R22.1@6660,2412.56 6661,2413.56 6661,2480.03 D9.2@6662,2481.03 ; D9.2@6661,2484.53 D9.2@6662,2485.53
NetD10_2: D10.2 R23.1 | length 91.6
  Top Layer w15: R23.1@6657,1960.56 R23.1@6658,1961.56 ; D10.2@6658,2040.53 D10.2@6659,2041.53 6660,2040.53 6660,1954.56 R23.1@6661,1953.56
NetD12_2: D12.2 R25.1 | length 99
  Top Layer w20: R25.1@6655,3557.56 D12.2@6655,3656.53
NetD13_2: D13.2 R26.1 | length 99
  Top Layer w10: R26.1@6655,4057.56 D13.2@6655,4156.53
NetD14_2: D14.2 R27.1 | length 99
  Top Layer w20: R27.1@6655,4557.56 D14.2@6655,4656.53
NetD15_2: D15.2 R28.1 | length 99
  Top Layer w20: R28.1@7630,1557.56 D15.2@7630,1656.53
NetD16_2: D16.2 R29.1 | length 99
  Top Layer w20: R29.1@7630,2057.56 D16.2@7630,2156.53
NetD17_2: D17.2 R30.1 | length 91.8
  Top Layer w20: R30.1@7630,2579.19 D17.2@7630,2671
NetD18_2: D18.2 R31.1 | length 83.8
  Top Layer w20: D18.2@7632,3154.53 7633,3153.53 7633,3072.56 R31.1@7634,3071.56
NetD19_2: D19.2 R32.1 | length 99
  Top Layer w20: R32.1@7630,3557.56 D19.2@7630,3656.53
NetD20_2: D20.2 R33.1 | length 99
  Top Layer w20: R33.1@7630,4057.56 D20.2@7630,4156.53
NetD21_2: D21.2 R34.1 | length 100.1
  Top Layer w10: R34.1@7684.56,4390 D21.2@7784.69,4390
NetD25_A: D25.A R47.2 | length 163.4
  Bottom Layer w15: D25.A@1185,2045 1302.56,2045 R47.2@1335,2012.56
NetD26_2: D26.2 R48.1 | length 83.9
  Top Layer w20: R48.1@6659,3136.56 D26.2@6659,3220.46
NetLD2_5: LD2.5 R70.2 | length 230.1
  Top Layer w10: R70.2@3902.42,2205.43 3904.09,2207.11 4123.84,2207.11 LD2.5@4129.46,2201.5
NetLD3_5: LD3.5 R71.2 | length 266.3
  Top Layer w10: R71.2@3882,2021.1 3885.94,2021.1 3919.79,1987.25 4061.09,1987.25 4075.58,1972.76 LD3.5@4128.23,1972.76
NetQ7_4: Q7.4 R46.2 | length 164.5
  Top Layer w10: Q7.4@3272.28,4550 3280,4550 v1(3320,4590)
  Bottom Layer w10: v1(3320,4590) 3342.44,4590 R46.2@3397.44,4535
NetQ8_2: Q8.2 R14.1 | length 545.3
  Top Layer w10: R14.1@3626.78,1608.72 3626.78,1604.78 3657.96,1573.6 3754.99,1573.6 3766.8,1561.79 3917.76,1561.79 3934.98,1579 3994.01,1579 4011.22,1596.21 4011.22,1669 4002.1,1678.12 Q8.2@3966.9,1678.12 ; R14.1@3628.56,1604.41 R14.1@3628.56,1608.35
NetQ11_3: Q11.3 R43.1 R46.1 | length 463.8
  Bottom Layer w10: Q11.3@3425,4140.71 3424.76,4140.71 3355,4210.47 3355,4417.56 R43.1@3397.44,4460 3397.44,4468.98 3452.56,4524.09 R46.1@3452.56,4535
NetQ12_1: Q12.1 R49.2 | length 227.7
  Top Layer w10: R49.2@5715,3737.56 5718.75,3733.81 5848.32,3733.81 5891.65,3690.47 5891.65,3679.41 5898.46,3672.6 Q12.1@5909.29,3672.6
NRST: CN1.32 CON1.B12 | length 3217.2
  Top Layer w10: v1(2729.23,3920) 2729.23,3910 2716,3896.77 2716,3435.07 v1@2730,3421.07
  Bottom Layer w10: CN1.32@2351.54,2161.23 2290,2222.76 2290,2386.96 2477,2573.96 2477,2728.96 2495.76,2747.72 2495.76,2781.73 2538.12,2824.09 2586.49,2824.09 2633,2870.6 2633,2938.38 2717,3022.38 2717,3368.11 2729.23,3380.34 v1(2729.23,3420.3) ; v1(2729.23,3920) 2729.23,3914.88 2747.53,3933.18 2782.44,3933.18 2805.62,3910 3309.34,3910 3481.34,4082 3524.96,4082 3575.9,4132.94 3575.9,4207.45 3608.45,4240 3668.02,4240 CON1.B12@3718.02,4190
OV: JMP2.2 R12.2 R13.1 U7.3 | length 397.8
  Top Layer w10: JMP2.2@3428,1396.03 3480.98,1449.01 R13.1@3567.44,1449.01 3567.44,1429.13 R12.2@3622.56,1374.01 3650.75,1402.2 U7.3@3748.43,1402.2 ; JMP2.2@3439.53,1395 JMP2.2@3439.53,1396.04
PRECHRG_CTRL: CN1.6 CON1.A9 | length 1169.8
  Bottom Layer w10: CN1.6@2568.07,4011.62 2568.07,3936.93 2646,3859 3587.02,3859 CON1.A9@3618.02,3890
PUMP_CTRL: CON1.B6 LD3.3 | length 1806.5
  Top Layer w10: v1(3937.77,2149) 3937.77,2143.35 4045.37,2035.75 LD3.3@4128.23,2035.75
  Bottom Layer w10: CON1.B6@3719,3590 3800,3509 3800,3414.04 3811.13,3402.91 3811.13,3151.43 3811,3151.3 3811,3132.34 3850.3,2973.49 ; v1(3937.77,2149) 3937.77,2298.17 3947.5,2307.9 3947.5,2451.39 3931.39,2467.5 3920.68,2467.5 3916.54,2467.5 3910.68,2473.36 3905.96,2481.44 3904.87,2483.32 3902.8,2503.63 3902.71,2506.09 3892.58,2847.38 3892.37,2852.71 3888.94,2871.91 ccw(c3623.11,2824.62) 3888.91,2872.1 3885.31,2898.88 3870.1,2934.69 ; 3850.3,2973.49 cw(c3588.84,2815.58) 3870.1,2934.69 ; 3850.3,2973.49 cw(c3588.84,2815.58) 3870.1,2934.69
PUMP_FB: CON2.A9 LD3.4 | length 4461.5
  Top Layer w10: CON2.A9@889,3890 929.44,3890 971.55,3847.88 1202.33,3847.88 1654.21,3396 1854,3396 2125,3125 2788.03,3125 2794.53,3131.5 2826.5,3131.5 v1(2840,3145) ; v1(2850,2595) 2850,2562 2952,2460 3680,2460 3725,2415 3725,2374.01 3724.91,2373.91 3724.91,2311.46 4032.11,2004.25 LD3.4@4128.23,2004.25
  Bottom Layer w10: v1(2840,3145) 2850.5,3134.5 2850.5,3074.5 2858.5,3066.5 2858.5,3022.83 2876.5,3004.83 2876.5,2785.54 2850.5,2759.54 2850.5,2641.57 2858,2634.07 2858,2603 v1(2850,2595)
PUMP_FUSE: D22.2 F4.1 F4.2 LD3.8 LD3.9 LD3.10 LD3.11 R37.2 | length 4460.7
  Top Layer w100: 4380,2030 4430.83,2030
  Top Layer w130: F4.2@7222.88,2546.93 F4.1@7222.88,2413.07 7531.93,2413.07 7563,2382
  Top Layer w150: 4430.83,2030 5027.77,1433.06 5172.3,1433.06 6294,1433.06
  Bottom Layer w150: v2(6318.57,1427.52) 6689.27,1798.22 7299.22,1798.22 7581,2080 v2(7581,2359.86)
PUMP_PWR: CN2.4 D9.1 F4.3 F4.4 | length 2109.6
  Top Layer w70: D9.1@6662,2552.46 v2(6662,2671)
  Top Layer w130: F4.3@6833.12,2413.07 F4.4@6833.12,2546.93
  Top Layer w150: CN2.4@5615.68,1971 6103,1971 6291,1783
  Bottom Layer w90: v2(6318.57,1800) 6412.78,1894.22 6412.78,2576.78 6507,2671 v2(6662,2671)
RED_LED_GND: CN2.16 L1.2 | length 947.9
  Top Layer w20: CN2.16@5609.06,2751.78 5609.06,2774.06 5635,2800 5873.18,2800 6159,3085.82 6159,3209 6225,3275 L1.2@6255,3275
SCHT_FROM_AUX_TO_ACC: CN1.30 CN2.6 | length 2853.3
  Bottom Layer w20: CN1.30@2568.07,2358.08 2639.99,2430 3397.12,2430 3464.26,2362.86 3464.26,2328.18 3617.83,2174.61 3795.5,2174.61 3922.61,2047.5 4152.22,2047.5 4155.18,2050.46 4613.53,2050.46 4699.61,1964.38 CN2.6@5175.98,1964.38
SCHT_OUT_LATCH: CN2.19 L2.1 | length 1641.6
  Top Layer w20: L2.1@4185,3000 4258,3073 4623.82,3073 4841.82,2855 5547.56,2855 5609.06,2916.5 CN2.19@5609.06,2988
SCHT_TAP: CN1.21 CN2.18 CN2.21 CON1.A6 | length 4251.5
  Top Layer w10: v1(2665,3575) 2682,3558 2682,3433.07 v1(2670,3421.07) ; CON1.A6@3618.02,3590 3663.02,3635 v1(3820,3635) ; v1(3820,3635) 3830,3635 3820,3645 v1(3820,3635)
  Bottom Layer w10: CN1.21@2568.07,2988 2634.54,2988 2683,3036.46 2683,3368.11 2672.5,3378.61 v1@2672.5,3421.07 ; v1(2665,3575) 2683,3557 3585.02,3557 CON1.A6@3618.02,3590 ; v1(3820,3635) 3802,3617 3802,3581.08 3851,3532.08 3851,3435.17 3873.67,3412.5 3891.39,3412.5 3907.5,3396.39 3907.5,3373.61 3879.13,3345.24 3879.13,3275.87 3893.48,3261.52 5135.07,3261.52 5153.08,3279.53 5198.89,3279.53 5235,3243.42 5235,3195 5175.98,3135.98 CN2.21@5175.98,2988
  Bottom Layer w15: CN2.18@5175.98,2751.78 CN2.21@5175.98,2988
SENS_PWR: D13.1 F8.3 F8.4 | length 363.1
  Top Layer w20: D13.1@6660.43,4228.9 D13.1@6655,4223.46 6803.55,4223.46 6843.16,4183.86 F8.4@6860.12,4183.86 F8.3@6860.12,4050
SERIAL_Rx: CN1.36 CON2.A15 | length 3758.2
  Top Layer w10: CON2.A15@889,4490 929.44,4490 971.55,4532.12 1061.33,4532.12 1142.21,4613 1269.79,4613 1360,4522.79 1360,4354.74 v1(1723.87,3990.87) ; v1(1670,2834) 1661.25,2825.25 1661.25,2728.92 2156.64,2233.54 2164.95,2233.54 2313,2085.49 2313,2077.17 2388.28,2077.17 2501.08,1964.38 CN1.36@2568.07,1964.38
  Bottom Layer w10: v1(1670,2834) 1670,2984.23 1715.18,3029.42 1715.18,3947.88 1721.5,3954.2 1721.5,3988.5 v1(1723.87,3990.87)
SERIAL_Tx: CN1.37 CON2.A14 | length 4054.6
  Top Layer w10: CON2.A14@889,4390 929.44,4390 971.55,4432.12 990.68,4432.12 1069,4510.44 1069,4515.75 1149.25,4596 1262.75,4596 1343,4515.75 1343,4318 v1(1694,3967) ; v1(1641.13,2858.87) 1642.5,2857.5 1642.5,2821.75 1644.25,2820 1644.25,2721.88 2149.6,2216.54 2157.91,2216.54 2190.31,2184.14 2190.31,2175.82 2305.96,2060.17 2381.24,2060.17 2426,2015.41 2426,1947 2246.53,1767.53 CN1.37@2135,1767.53
  Bottom Layer w10: v1(1641.13,2858.87) 1641.13,2979.4 1698.18,3036.46 1698.18,3962.82 v1(1694,3967)
SHCT_IN_LATCH: CN2.20 L3.5 | length 2557.7
  Bottom Layer w20: L3.5@4185,3940 4155,3940 4080,3865 4080,3755 4473.88,3361.12 4821.12,3361.12 5150,3690 5215,3690 5455,3450 5455,3385 5332.21,3262.21 5332.21,3187.79 5392.52,3127.48 CN2.20@5392.52,2988
SHDN: R17.2 U7.5 | length 260.9
  Top Layer w10: U7.5@3851.57,1376.61 3848.7,1379.49 3825.43,1379.49 3815.56,1389.36 3815.56,1470.47 3832.53,1487.44 R17.2@3947,1487.44
Source: Q9.3 Q10.3 | length 1016
  Top Layer w200: Q9.3@2782,1466.5 2782,1475.5 2790.5,1484 3077,1484 ; Q10.3@3075,1964.38 3077,1966.38 Q10.3@3077,2078.01
  Bottom Layer w200: 3077,1484 3077,2078.01
  other v1: 3091.95,1411 3091.95,1453.39 3091.95,1509 3091.95,1553.72 3027,2117 3120,2117
  other v2: 3139.38,1484 3075.04,2143.35
SWCLK: CN1.31 CON1.A13 | length 3235
  Top Layer w10: v1(2700,3390) 2699,3391 2699,3954 v1(2700,3955)
  Bottom Layer w10: CN1.31@2135,2161.23 2211.46,2161.23 2273,2222.76 2273,2394 2460,2581 2460,2736 2478.76,2754.76 2478.76,2788.77 2531.08,2841.09 2579.45,2841.09 2616,2877.64 2616,2945.42 2700,3029.42 v1(2700,3390) ; v1(2700,3955) 2704.82,3950.18 2789.48,3950.18 2789.55,3950.11 2812.66,3927 3302.29,3927 3474.29,4099 3517.92,4099 3558.9,4139.98 3558.9,4230.88 CON1.A13@3618.02,4290
SWDIO: CN1.29 CON1.A12 | length 2769.4
  Top Layer w10: v1(2756.73,3385) 2756.73,3431.69 2733,3455.43 2733,3871 2767.68,3905.68 v1(2768.68,3905.68)
  Bottom Layer w10: CN1.29@2351.54,2358.08 2351.54,2424.45 2494,2566.92 2494,2721.92 2512.76,2740.68 2512.76,2774.69 2545.16,2807.09 2593.53,2807.09 2650,2863.56 2650,2931.33 2734,3015.33 2734,3359 2756.73,3381.73 v1(2756.73,3385) ; v1(2768.68,3905.68) 2772.36,3905.68 2785.04,3893 3316.38,3893 3488.38,4065 3532,4065 3611.1,4144.1 3611.1,4183.09 CON1.A12@3618.02,4190
SWO: CN1.16 CON2.B14 | length 1715.4
  Top Layer w20: CON2.B14@989,4390 1074.18,4390 1190.97,4273.21 1233.79,4273.21 v1(1971,3536)
  Bottom Layer w20: v1(1971,3536) 1971,3388.22 CN1.16@2135,3224.22
TRIG: C10.1 R9.2 U4.2 U4.6 | length 566.7
  Top Layer w10: U4.6@3053.78,4225 3102.56,4225 3192.56,4135 ; R9.2@3192.56,3880 3192.56,3881.97 3203.31,3892.72 3205.28,3892.72 3232.56,3920 3232.56,3990 3205.28,4017.28 3203.31,4017.28 3192.56,4028.03 C10.1@3192.56,4030 3192.56,4135 ; U4.2@3276.22,4175 3232.56,4175 3192.56,4135
TRIG: C19.1 R42.2 U8.2 U8.6 | length 489.9
  Bottom Layer w10: U8.2@3585.2,1434.65 3670.24,1434.65 ; R42.2@3740.87,1232.44 3732.31,1241 3724.31,1241 3688.5,1276.81 3678.58,1276.81 3667.83,1287.56 C19.1@3665.87,1287.56 3670.24,1291.93 3670.24,1434.65 ; U8.6@3807.65,1484.65 3720.24,1484.65 3670.24,1434.65
TS_ACTIVE: CN1.27 L1.5 | length 4523.5
  Top Layer w10: CN1.27@2563.04,2559.96 2574.07,2559.96 2607.11,2593 2677.11,2593 2730,2645.89 2730,2762.04 2787.96,2820 3095,2820 3137.79,2777.21 3137.79,2752.21 3183.29,2706.71 3849.63,2706.71 3916,2773.08 3916,2922.66 4002.56,3009.22 v1(4002.56,3032) ; v1(4695,2705) 4708.76,2691.24 5640.94,2691.24 5714.71,2765 v1(5770,2765)
  Bottom Layer w10: v1(4002.56,3032) 4016.89,3032 4107.39,2941.5 4488.5,2941.5 4679,2751 4679,2721 v1(4695,2705) ; v1(5770,2765) 5752,2783 5752,3162 5795,3205 5885,3205 L1.5@5955,3275
TSAL_PWR: CN2.14 D16.1 F12.3 F12.4 | length 2758.8
  Top Layer w20: CN2.14@5392.52,2554.93 5487.25,2554.93 5558.18,2484 5737.37,2484 5766.37,2455 v1(6577,2455) ; v1(7005,2470) 7005,2407.82 7189.35,2223.46 D16.1@7630,2223.46 F12.4@7830.12,2223.46 F12.3@7830.12,2089.61
  Bottom Layer w20: v1(6577,2455) 6781.74,2455 6798.15,2471.41 7003.59,2471.41 v1(7005,2470)
UV_DELAY: Q8.1 R41.2 UV_DELAY.1 | length 345.9
  Top Layer w10: UV_DELAY.1@3784,1603.31 Q8.1@3966.9,1603.31 ; UV_DELAY.1@3786.81,1620.71 UV_DELAY.1@3800.08,1620.71
  Bottom Layer w10: R41.2@3668.44,1611 3668.44,1614.94 3694.22,1640.72 3753.52,1640.72 3784,1610.24 UV_DELAY.1@3784,1603.31
VBATT_RAW: CN1.34 D25.K U2.1 U2.2 VBATT_RAW.1 WM1.1 WM9796-ND.1 | length 5003.3
  Top Layer w200: WM1.1@1072,2384.23 WM1.1@1072,2211 678.3,1817.3 WM9796-ND.1@678.3,1585.23 WM9796-ND.1@678.3,1412 854.2,1236.1 1501.1,1236.1 1530,1265 1600,1265
  Bottom Layer w15: D25.K@1185,1925 1186.77,1923.23 1186.77,1803.15
  Bottom Layer w200: WM9796-ND.1@678.3,1412 WM9796-ND.1@678.3,1585.23 ; WM1.1@1072,2384.23 WM1.1@1072,2211 678.3,1817.3 WM9796-ND.1@678.3,1585.23 ; CN1.34@2135,1939.92 2016.07,1939.92 1972.15,1896 1791,1896 1698.15,1803.15 1186.77,1803.15 896.22,1803.15 WM9796-ND.1@678.3,1585.23
VCU_PWR: CN2.25 D17.1 F13.3 F13.4 | length 3670.1
  Top Layer w20: v1(7425,3835) 7425,3820 7526,3719 7526,2841.93 D17.1@7630,2737.93 7631.5,2736.43 7829.62,2736.43 F13.4@7831.12,2734.93 F13.3@7831.12,2601.07 ; F13.4@7830.04,2755.96 F13.4@7831,2755 ; F13.3@7830.12,2592.14 F13.3@7832,2594.02
  Bottom Layer w20: CN2.25@5609.06,3421.07 5677.63,3352.5 6367.06,3352.5 6463.69,3352.5 6592.29,3481.09 7248.09,3481.09 7425,3658 v1(7425,3835)
VS: C14.2 C15.2 C16.1 C17.2 C18.2 C20.2 C21.2 F9.1 F9.2 F10.1 F10.2 F11.1 F11.2 F12.1 F12.2 F13.1 F13.2 F14.1 F14.2 F15.1 F15.2 F16.1 F16.2 F17.1 F17.2 LD1.7 LD1.12 LD1.13 LD2.13 LD3.13 Q10.2 R40.1 U7.7 VS.1 | length 11319.3
  Top Layer w10: U7.7@3867.72,1427.8 U7.7@3851.57,1427.8 3851.69,1427.68 3976.4,1427.68 R40.1@3976.52,1427.56 ; R40.1@3981.12,1424 4131.11,1424 4181.61,1373.5 4212.16,1373.5 4229.59,1390.92 4376.07,1390.92 4408.76,1358.24 4494.15,1358.24 4542.3,1310.09 C16.1@4542.3,1253 C16.1@4542.3,1195.91
  Top Layer w20: C20.2@3947.5,1894.44 C21.2@4048.35,1894.44 C21.2@4051.61,1891.18 ; v1(4056,2632) 4095,2593 4266.56,2593 4303.82,2555.74 LD1.12@4332.44,2555.74 ; C14.2@4056.56,2140.11 4235.56,2140.11 ; LD1.13@4235,2443.54 LD1.13@4235,2477 4235,2510.46 4280.12,2555.58 4332.28,2555.58 LD1.12@4332.44,2555.74 ; 4280.12,2398.42 4332.28,2398.42 LD1.7@4332.44,2398.26 ; C15.2@4335.44,2608 4335.44,2555.9 4335.28,2555.74 LD1.12@4332.44,2555.74 ; F9.2@7249.11,4676.93 F9.1@7249.11,4543.07 7249.88,4542.3 7249.88,4491.1 7420.98,4320 8090,4320 7944.88,4465.12 F10.1@7944.88,4543.07 F10.2@7944.88,4676.93
  Top Layer w40: 8090,4320 8181.1,4228.9 8224.88,4228.9
  Top Layer w110: 4193.67,1725.49 4235,1766.82 LD3.13@4235,2020 4235,2139 4236.11,2140.11 LD2.13@4236.11,2248.62 ; LD2.13@4238,2301 4238,2362.4 4238.34,2362.74 v1@4238.34,2387.56
  Top Layer w200: 3189,1687.38 3442.87,1687.38 3524.99,1769.5 3848.68,1769.5 3876.11,1796.93 4122.22,1796.93 4193.67,1725.49 4470.51,1725.49 4650.51,1545.49 4650.51,1249 6457.61,1249 6465.61,1241 7836,1241 8224.88,1629.88 F11.2@8224.88,1728.9
  Bottom Layer w20: C18.2@4007.56,2528 4007.56,2583.56 v1(4056,2632)
  Bottom Layer w50: C17.2@4026,2365 4231,2365 v1(4239,2373)
  Bottom Layer w110: F17.1@7243.88,3152.07 F17.2@7243.88,3285.93 7347.95,3390 v2(8225,3390)
VS_FROM_MS: C3.2 C19.2 CN2.3 D5.1 JMP3.2 Q9.2 R11.1 R13.2 R17.1 R18.1 R50.2 U7.1 U8.4 U8.8 VS_FROM_MS.1 | length 5997.8
  Top Layer w10: JMP3.2@3328,1524 3381.53,1470.47 3536.19,1470.47 3555.72,1490 3581.57,1490 ; R13.2@3622.56,1449.01 3581.57,1490 ; R11.1@3622.56,1524.01 3588.55,1490 3581.57,1490 ; U7.1@3748.43,1453.39 U7.1@3766.54,1453.39 ; v1(3800,1343.83) 3800,1348.65 3792,1356.65 3792,1433.08 3771.69,1453.39 3860.87,1542.56 R17.1@3947,1542.56 3947.5,1542.06 4009.5,1542.06 R18.1@4010,1541.56 v1(4056.52,1541.56) 4082.3,1567.34 4155.32,1567.34 4155.32,1563.22 D5.1@4205.54,1513
  Top Layer w200: 2724,1743.5 2724,1913
  Bottom Layer w10: JMP3.2@3328,1524 3395.68,1456.32 3485,1456.32 ; U8.4@3585.2,1534.65 3585.2,1553.72 3579.16,1559.76 3490.86,1559.76 3485,1553.91 3485,1456.32 ; U8.8@3807.65,1384.65 3806.45,1384.65 3798.65,1376.85 3800,1375.5 v1(3800,1343.83) 3832,1311.83 3832,1275.11 3763.55,1206.66 3693.61,1206.66 3667.83,1232.44 C19.2@3665.87,1232.44 3654.31,1244 3646,1244 3613.19,1276.81 3603.58,1276.81 3592.83,1287.56 C3.2@3590.87,1287.56 R50.2@3515.87,1287.56 3513.9,1287.56 3503.15,1298.31 3503.15,1298.85 3485,1317 3485,1456.32 ; v1(4056.52,1541.56) 4108.44,1541.56 4231,1419 VS_FROM_MS.1@4415,1419
  Bottom Layer w200: 2724,1913 2724,2138.84 2871.16,2286 2872.15,2285.01 3162.74,2285.01 3284,2163.75 3284,1893.57 3416.57,1761 4073,1761 VS_FROM_MS.1@4415,1419 ; 4469.49,1490 4747.39,1490 5024.91,1767.53 CN2.3@5140,1767.53
  other v1: 2655,1892 2702.78,1892 2747,1892 2792,1892 2655,1933 2702.78,1933 2747,1933 2792,1933
  other v2: 2724,1981
VS_TO_MS: CN2.2 U2.3 U2.4 VS_TO_MS.1 | length 4169
  Top Layer w200: 1840,1273 1984,1129 VS_TO_MS.1@4073,1129
  Bottom Layer w200: 3976.52,1137 VS_TO_MS.1@4081,1137 5102,1137 5392.52,1427.52 CN2.2@5392.52,1767.53
  other v1: 3968,1066 4003.98,1066 3968,1108 4003.98,1108 3968,1151 4003.98,1151 3968,1188 4003.98,1188
pads on no net: CN1.19 CN1.33 CN1.38 CN1.39 CN2.10 CN2.11 CN2.26 CN2.32 CN2.35 LD1.2 LD2.1 LD2.6 LD2.7 LD2.12 LD3.1 LD3.6 LD3.7 LD3.12 U4.5 U4.7 U8.5 U8.7
copper on no net:
  other v4: 452.71,1571.45 1297.59,1571.45

## Polygon pours and split planes (outlines as drawn)
GND on Top Layer "GND_L01_P002" (solid, pour order 2): 274,1020 274,4860 277,4863 8414,4863 8414,1022 8415,1021
GND on Bottom Layer "GND_L02_P003" (solid, pour order 3): 274,4860 277,4863 8414,4863 8414,1022 8412,1020 277.54,1020

## Other copper
Top Layer:
  region net VS_TO_MS: 1905,1135 1905,1400 1710,1400 1710,1135
  rectangle net PUMP_PWR: 6628,2516 6881,2591
  region net VBATT_RAW: 1696.54,1265 1696.54,1360 1561.54,1360 1561.54,1265
  region net VS: 8325,1417 8325,4290 8125,4290 8125,1417
  region net PUMP_FUSE: 4317,2074 4317.36,2073.64 4317.36,1964.38 4367.34,1964.38 4367.09,1964.63 4367.09,2074.06
  region net FANS_FUSE: 4317,2301 4317.36,2300.64 4317.36,2197.56 4367.58,2197.56 4367.09,2198.06 4367.09,2301

## Silkscreen, mask and mechanical layers (free items; w line width, h text height)
Top Overlay:
  drawing of 19 lines, arcs and shapes, not listed
  text "ACU" at 7624,4764 h60
  text "IMD" at 6595.45,4557.56 h60 r90
  text "AMS_LED" at 5672,4198 h30
  text "SENS" at 6595,4020 h60 r90
  text "BRAKE_SW" at 5664,3997 h30
  text "EMETER_PWR" at 1772,3995 h30
  text "E_METER" at 7564,3880 h60 r90
  text "BRAKE_SENS" at 5655,3854 h30
  text "IMD_RESIST" at 1794,3799 h30
  text "EXTRA_INPUT2" at 1716,3603 h30
  text "AMS" at 7550,3535 h60 r90
  text "BUZR" at 6595,3528.03 h60 r90
  text "PRAKE_PRESSn" at 5574,3523 h30
  text "AIR-_FB" at 1864,3405 h30
  text "VCU_PWR" at 5668,3405 h30
  text "CAN_SENS_P" at 2640,3213 h30
  text "BRAKE_PWR" at 5488,3126 h30
  text "HVB" at 7560,3065 h60 r90
  text "SCHT_TAP" at 2530,3046 h30
  text "SCHT_OUT_LATCH" at 5681,2977 h30
  text "RED_LED_GND" at 5637,2796 h30
  text "HCP_L_CURR_SENS" at 2626,2772.5 h30
  text "BSPD TEST" at 6619.75,2751.78 h60 r90
  text "5V" at 3635,2579 h60
  text "VCU" at 7562,2566 h60 r90
  text "BUZR_PWR" at 5670,2539.93 h30
  text "TS_ACTIVE" at 2552,2464 h30
  text "3V3" at 1640.12,2427.09 h60
  text "GND" at 2099,2419 h30
  text "SWDIO" at 2289,2415 h30
  text "PUMP" at 6610,2350 h60 r90
  text "NRST" at 2299,2221.89 h30
  text "SWCLK" at 2079,2220 h30
  text "FANS_PWR" at 5661.26,2147.92 h30
  text "RVRS" at 1575,2040 h60 r90
  text "TSAL" at 7564,2039 h60 r90
  text "3V3" at 2319,2018 h30
  text "PUMP_PWR" at 5670.06,1949.88 h30
  text "VBATT_RAW" at 2030,1882 h30
  text "MC_PW" at 6589,1876 h60 r90
  text "LATCH_RST" at 5675.85,1752.53 h30
  text "UV DELAY" at 3636,1645.45 h25
  text "EN" at 3518.76,1638.65 h30
  text "DIS" at 3285,1586.56 h30
  text "UV/OV FAULT" at 4129.46,1561.79 h30
  text "FANS" at 6590,1520 h60 r90
  text "BRAKE" at 7565,1502 h60 r90
  text "VS" at 4128.98,1271.4 h30
  text "LV PROT DISABLE" at 3140,1229 h30
  text "UV / OV" at 3404,1229 h30
  text "CHARGING" at 925,1224 h60
  text "ePBR23_ACU_Power_rev0" at 6545,1156.86 h60
Board Outline:
  lines w10: 264,1013 264,4867 267,4870 8422,4870 8422,1013 264,1013